# Altium PCB ACX720-v2机械文件.PcbDoc
Units mil, origin at the board's own origin, x right, y up, seen from the top; angles counter-clockwise.
Board outline 5900.04 x 4300 mil, 2 copper layers (TOP, BOTTOM), stack 10.4 mil thick; 33 components, 449 nets, 276 pads, 32 vias.
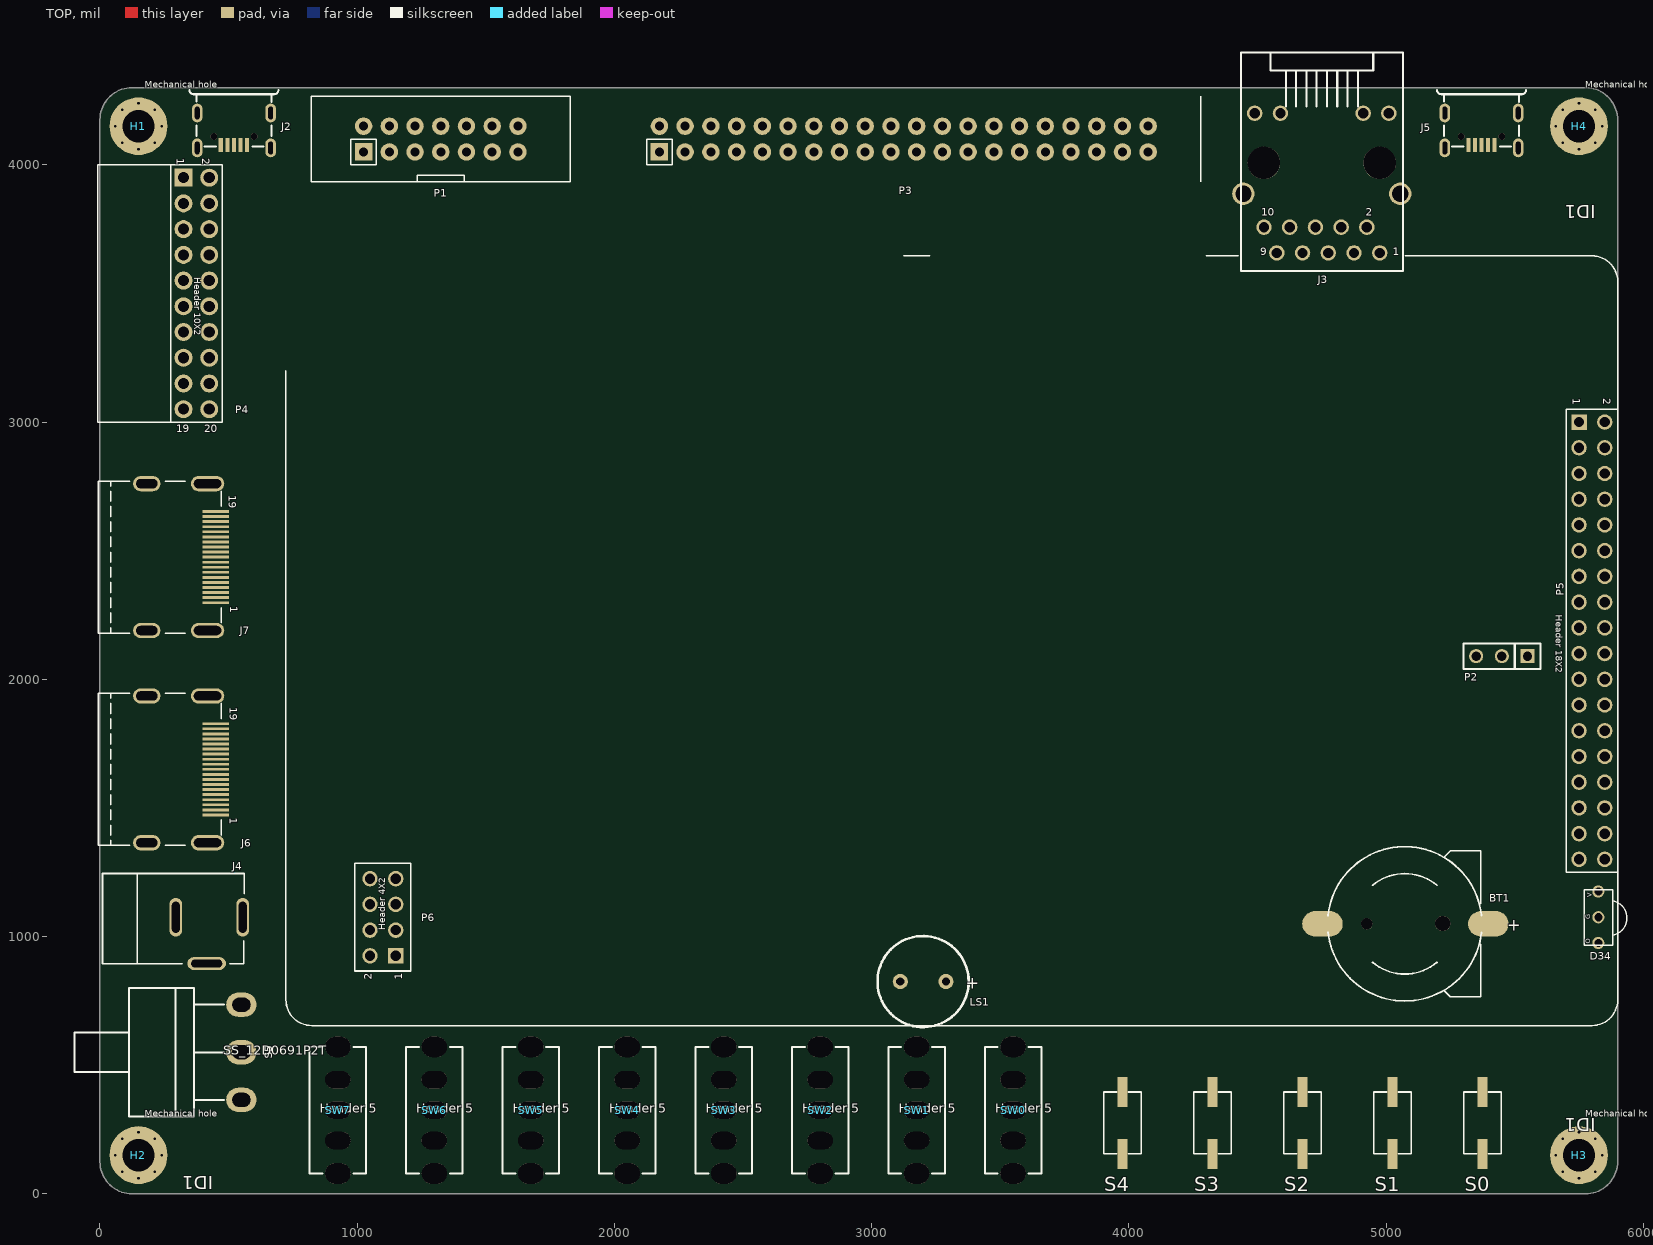
[diagram p0: TOP view]
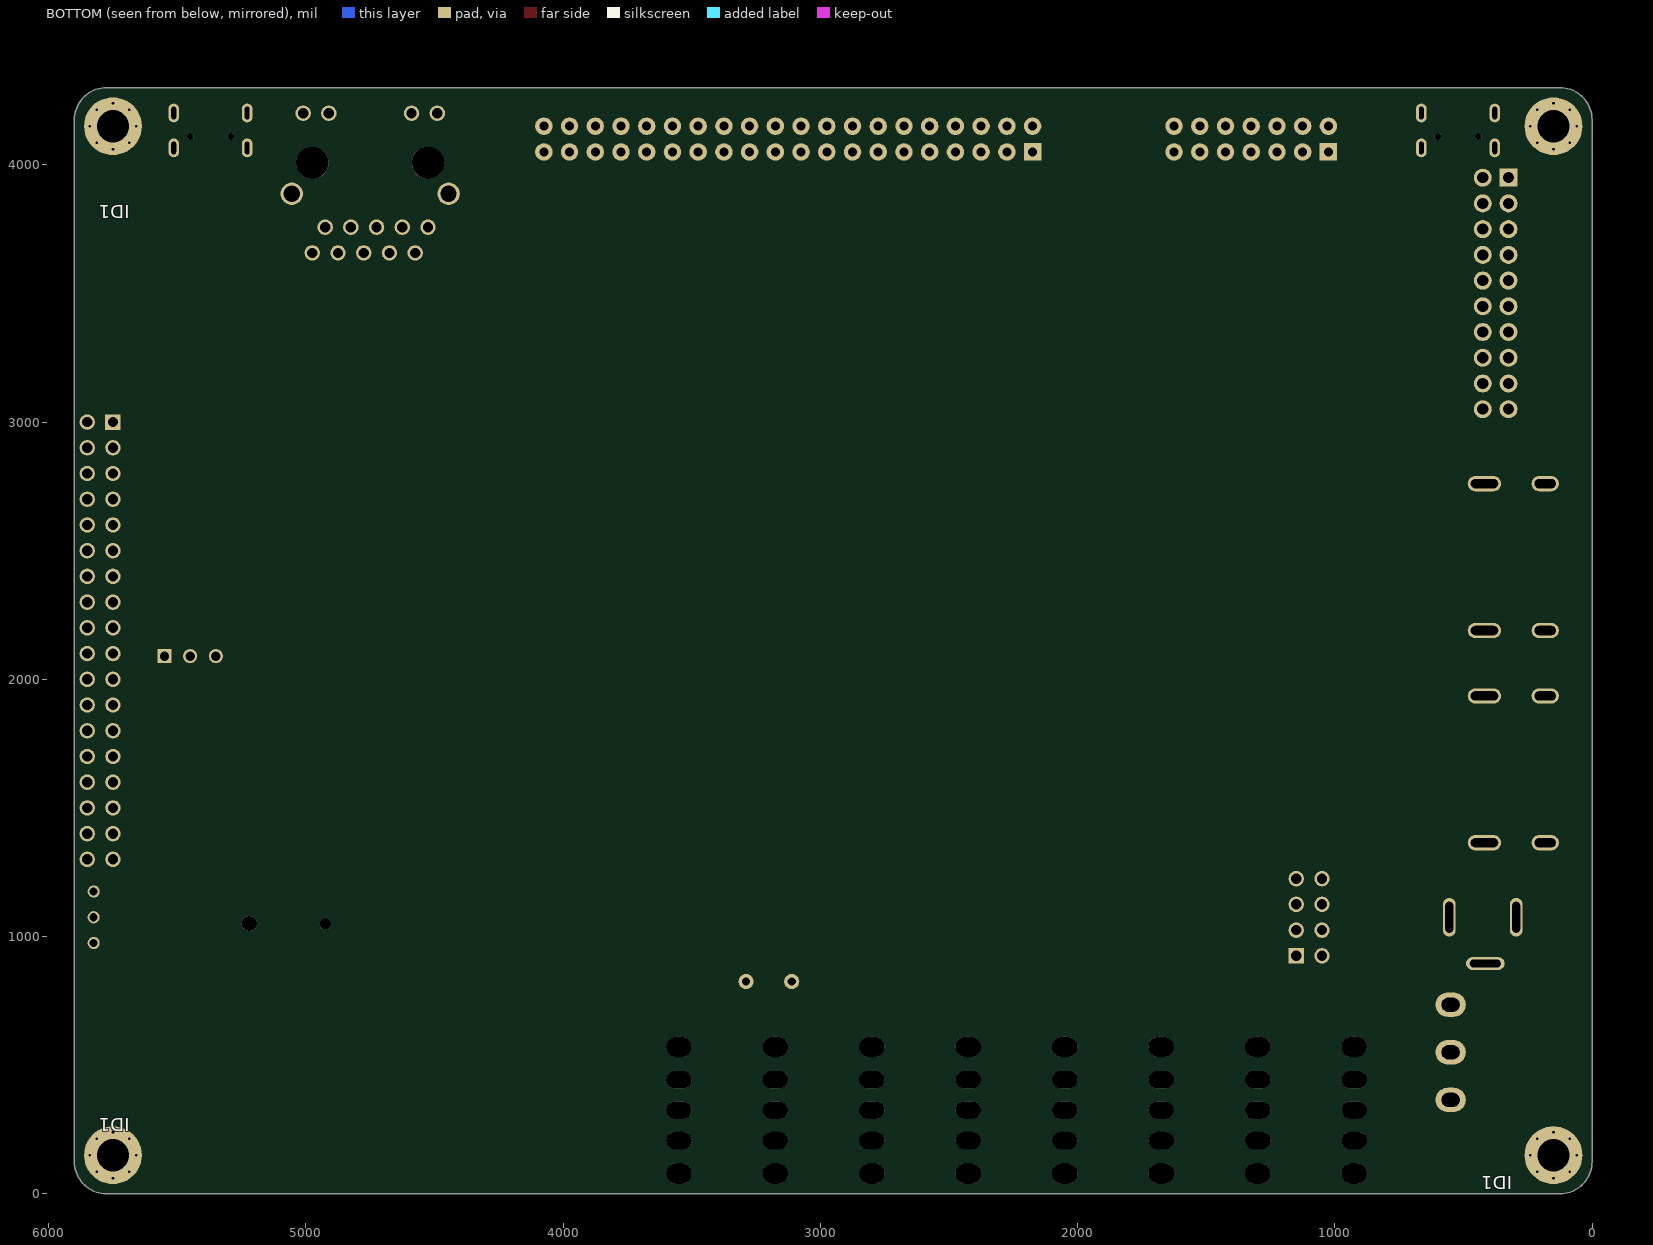
[diagram p1: BOTTOM view, seen from below]

## Layer stack, top to bottom
Top Solder: solder mask 0.4, Solder Resist, Dk 3.5
TOP: signal copper 1.2
Dielectric 1: core 8, FR-4, Dk 4.5
BOTTOM: signal copper 1.2
Bottom Solder: solder mask 0.4, Solder Resist, Dk 3.5

## Board outline
125,0 cw(c125,125) 0,4175 cw(c125,4175) 5775,4300 cw(c5775,4175) 5900.04,125 cw(c5775.04,125) 125,0

## Design rules (kind name [scope] priority, off if disabled: settings)
Clearance [All] p1: gap=10 ignorepadtopadclearanceinfootprint=FALSE except(0: Arc-Hole Track-Hole SMDPad-Hole THPad-Hole Via-Hole Fill-Hole Poly-Hole Region-Hole Text-Hole)
DiffPairsRouting [All] p1: maxlimit=10 minlimit=10 mostfreqgap=10 toplayer_minwidth=15 toplayer_maxwidth=15 toplayer_prefwidth=15 bottomlayer_minwidth=15 bottomlayer_maxwidth=15 bottomlayer_prefwidth=15 maxuncoupledlength=500
PlaneConnect [All] p1: planeconnectstyle=Direct reliefexpansion=20 reliefentries=4 reliefconductorwidth=10 reliefairgap=10
PolygonConnect [All] p1: connectstyle=Direct reliefconductorwidth=10 reliefentries=4 polygonreliefangle="90 Angle" airgapwidth=10
RoutingVias [All] p1: holewidth=28 width=50 viastyle="Through Hole" minholewidth=28 minwidth=50 maxholewidth=28 maxwidth=50
SolderMaskExpansion [All] p1: expansion=4 istentingtop=FALSE
Width [All] p1: maxlimit=10 minlimit=10 preferedwidth=10 impedanceprofiledriven=TRUE minimp=52.570000 maximp=101.860000 favimp=46.590000
28 further rules are at their usual default settings.

## Classes and differential pairs
differential pair USB: +USB_N -USB_P
differential pair PHY_MDI3: +PHY_MDI3_N -PHY_MDI3_P
differential pair PHY_MDI2: +PHY_MDI2_N -PHY_MDI2_P
differential pair PHY_MDI1: +PHY_MDI1_N -PHY_MDI1_P
differential pair PHY_MDI0: +PHY_MDI0_N -PHY_MDI0_P
differential pair DIFFPAIR0: +NETJ2/2 -NETJ2/3
differential pair IO_L9_T1_DQS: +IO_L9N_T1_DQS/16 -IO_L9P_T1_DQS/16
differential pair DIFFPAIR13: +IO_L8N_T1/16 -IO_L8P_T1/16
differential pair DIFFPAIR10: +IO_L7N_T1/16 -IO_L7P_T1/16
differential pair DIFFPAIR12: +IO_L6N_T0_VREF/16 -IO_L6P_T0/16
differential pair DIFFPAIR8: +IO_L5N_T0/16 -IO_L5P_T0/16
differential pair DIFFPAIR14: +IO_L4N_T0/16 -IO_L4P_T0/16
differential pair DIFFPAIR11: +IO_L3N_T0_DQS/16 -IO_L3P_T0_DQS/16
differential pair DIFFPAIR5: +IO_L2N_T0/16 -IO_L2P_T0/16
differential pair DIFFPAIR15: +IO_L1N_T0/16 -IO_L1P_T0/16
differential pair DIFFPAIR4: +IO_L19N_T3_VREF/16 -IO_L19P_T3/16
differential pair DIFFPAIR1: +IO_L18N_T2/16 -IO_L18P_T2/16
differential pair IO_L17_T2: +IO_L17N_T2/16 -IO_L17P_T2/16
differential pair DIFFPAIR2: +IO_L15N_T2_DQS/16 -IO_L15P_T2_DQS/16
differential pair DIFFPAIR3: +IO_L14N_T2_SRCC/16 -IO_L14P_T2_SRCC/16
differential pair DIFFPAIR6: +IO_L13N_T2_MRCC/16 -IO_L13P_T2_MRCC/16
differential pair DIFFPAIR9: +IO_L12N_T1_MRCC/16 -IO_L12P_T1_MRCC/16
differential pair DIFFPAIR7: +IO_L11N_T1_SRCC/16 -IO_L11P_T1_SRCC/16
differential pair IO_L10_T1: +IO_L10N_T1/16 -IO_L10P_T1/16
differential pair HDMI2_D2: +HDMI2_D2_N -HDMI2_D2_P
differential pair HDMI2_D1: +HDMI2_D1_N -HDMI2_D1_P
differential pair HDMI2_D0: +HDMI2_D0_N -HDMI2_D0_P
differential pair HDMI2_CLK: +HDMI2_CLK_N -HDMI2_CLK_P
differential pair HDMI1_D2: +HDMI1_D2_N -HDMI1_D2_P
differential pair HDMI1_D1: +HDMI1_D1_N -HDMI1_D1_P
differential pair HDMI1_D0: +HDMI1_D0_N -HDMI1_D0_P
differential pair HDMI1_CLK: +HDMI1_CLK_N -HDMI1_CLK_P
differential pair DDR3_DQS_1: +DDR3_DQS_N1 -DDR3_DQS_P1
differential pair DDR3_DQS_0: +DDR3_DQS_N0 -DDR3_DQS_P0
differential pair DDR3_CK: +DDR3_CK_N -DDR3_CK_P
differential pair USB: +D_P -USB_N
differential pair USB: +D_N -D_P

## Components (designator, comment, footprint, x,y, rotation, side; value= is the part's Value field where it differs from the comment)
BT1 "CR1220" CR1220 5075.04,1049.51 r180 top
D34 "SIP3" SIP3 5825.04,1075 r90 top
H1 "HOLE5R715MM3R175MM-8STAR" HOLE5R715MM3R175MM-8STAR 150,4150 r0 top
H2 "HOLE5R715MM3R175MM-8STAR" HOLE5R715MM3R175MM-8STAR 150,150 r0 top
H3 "HOLE5R715MM3R175MM-8STAR" HOLE5R715MM3R175MM-8STAR 5750,150 r0 top
H4 "HOLE5R715MM3R175MM-8STAR" HOLE5R715MM3R175MM-8STAR 5750,4150 r0 top
J2 "USB-MICRO" USB-MICRO 525.04,4150 r180 top
J3 "RJ45_HR911130C" RJ45_HR911130C 4750,4020 r0 top
J4 "JACK_PWR" JACK_PWR 285.04,1070 r90 top
J5 "USB-MICRO" USB-MICRO 5375.04,4150 r180 top
J6 "HDMI_A" HDMI_A 262.99,1650 r270 top
J7 "HDMI_A" HDMI_A 262.99,2475 r270 top
LS1 "BEEP09X05" BEEP09X05 3200.04,825 r180 top
P1 "IDC3-14" IDC3-14 1322.54,4100 r0 top
P2 "HDR1X3" HDR1X3 5450.04,2090 r180 top
P3 "IDC-40J" IDC-40J 3125.04,4100 r0 top
P4 "HD20-100-R" HD20-100-R 232.5,3500 r270 top
P5 "HDR2X18" HDR2X18 5800,2150 r270 top locked
P6 "HDR2X4" HDR2X4 1100.04,1075 r90 top
S0 "SW-PB_3_6_4_3" SW-PB_3_6_4_3 5375.04,275 r90 top
S1 "SW-PB_3_6_4_3" SW-PB_3_6_4_3 5025.04,275 r90 top
S2 "SW-PB_3_6_4_3" SW-PB_3_6_4_3 4675.04,275 r90 top
S3 "SW-PB_3_6_4_3" SW-PB_3_6_4_3 4325.04,275 r90 top
S4 "SW-PB_3_6_4_3" SW-PB_3_6_4_3 3975.04,275 r90 top
S5 "SS12D06_1P2T_" SS12D06_1P2T_ 455.04,550 r0 top
SW0 "SW-1X2" SW-1X2 3550.04,325 r0 top
SW1 "SW-1X2" SW-1X2 3175.04,325 r0 top
SW2 "SW-1X2" SW-1X2 2800.04,325 r0 top
SW3 "SW-1X2" SW-1X2 2425.04,325 r0 top
SW4 "SW-1X2" SW-1X2 2050.04,325 r0 top
SW5 "SW-1X2" SW-1X2 1675.04,325 r0 top
SW6 "SW-1X2" SW-1X2 1300.04,325 r0 top
SW7 "SW-1X2" SW-1X2 925.04,325 r0 top

## Footprints (in the part's own frame and the unit in brackets; to place one, negate y for a bottom-side part, rotate by r counter-clockwise, add the part's x,y. Pads: shape width x height; smd on the part's side, far side on the other; paste and mask are expansions set on the pad)
BEEP09X05 [mil] "BEEP09X05"
  round 59.06 hole 31.5: 1(-88.58,0) 2(88.58,0)
  silkscreen extent -177,-177 177,177, body extent -128,-39 128,39, height 150
CR1220 [mil] "CR1220"
  round 59.06 hole 59.06 unplated: 0(-145.14,-0.98)
  round 43.31 hole 43.31 unplated: 0/2(150.14,0)
  oval 157.48x98.43 smd: 1(-322.5,0) 2(322.5,0)
  silkscreen extent -296,-300 301,300, body extent -401,-49 401,49, height 150
HD20-100-R [mil] "HD20-100-R"
  rect 70x70 / inner round 70 / far side rect 70x70 hole 43: 1(-450,92.5)
  round 70 hole 43: 2(-450,192.5) 3(-350,92.5) 4(-350,192.5) 5(-250,92.5) 6(-250,192.5) 7(-150,92.5) 8(-150,192.5) 9(-50,92.5) 10(-50,192.5) 11(50,92.5) 12(50,192.5) 13(150,92.5) 14(150,192.5) 15(250,92.5) 16(250,192.5) 17(350,92.5) 18(350,192.5) 19(450,92.5) 20(450,192.5)
  silkscreen extent -500,-241 500,243, body extent -500,-243 500,243, height 150
HDMI_A [mm] "HDMI_A"
  rect 0.28x2.6 smd: 1(4.5,4.75) 2(4,4.75) 3(3.5,4.75) 4(3,4.75) 5(2.5,4.75) 6(2,4.75) 7(1.5,4.75) 8(1,4.75) 9(0.5,4.75) 10(0,4.75) 11(-0.5,4.75) 12(-1,4.75) 13(-1.5,4.75) 14(-2,4.75) 15(-2.5,4.75) 16(-3,4.75) 17(-3.5,4.75) 18(-4,4.75) 19(-4.5,4.75)
  oval 1.5x3.3 hole 0.9 slot 2.7 at 90 deg: 20(-7.25,3.95) 21(7.25,3.95)
  oval 1.5x2.7 hole 0.9 slot 2.1 at 90 deg: 22(-7.25,-2.05) 23(7.25,-2.05)
  silkscreen extent -7.5,-6.85 7.5,5.3, body extent -7.5,-5.75 7.5,5.75, height 3.81
HDR1X3 [mil] "HDR1X3"
  rect 55x55 / inner round 55 / far side rect 55x55 hole 36: 1(-100,0)
  round 55 hole 36: 2(0,0) 3(100,0)
  silkscreen extent -150,-50 150,50, body extent -154,-54 154,54, height 150
HDR2X4 [mil] "HDR2X4"
  rect 60x60 / inner round 60 / far side rect 60x60 hole 40: 1(-150,-50)
  round 60 hole 40: 2(-150,50) 3(-50,-50) 4(-50,50) 5(50,-50) 6(50,50) 7(150,-50) 8(150,50)
  silkscreen extent -209,-109 209,109, body extent -210,-110 210,110, height 150
HDR2X18 [mil] "HDR2X18"
  rect 60x60 / inner round 60 / far side rect 60x60 hole 40: 1(-850,-50)
  round 60 hole 40: 2(-850,50) 3(-750,-50) 4(-750,50) 5(-650,-50) 6(-650,50) 7(-550,-50) 8(-550,50) 9(-450,-50) 10(-450,50) 11(-350,-50) 12(-350,50) 13(-250,-50) 14(-250,50) 15(-150,-50) 16(-150,50) 17(-50,-50) 18(-50,50) 19(50,-50) 20(50,50) 21(150,-50) 22(150,50) 23(250,-50) 24(250,50) 25(350,-50) 26(350,50) 27(450,-50) 28(450,50) 29(550,-50) 30(550,50) 31(650,-50) 32(650,50) 33(750,-50) 34(750,50) 35(850,-50) 36(850,50)
  silkscreen extent -1496,-5077 1496,100, body extent -900,-100 900,100, height 150
HOLE5R715MM3R175MM-8STAR [mil] "HOLE5R715MM3R175MM-8STAR"
  round 225 hole 125: 1(0,0)
  body extent -115,-115 115,115, height 150
IDC3-14 [mil] "IDC3-14"
  rect 68x68 / inner round 68 / far side rect 68x68 hole 35: 1(-297.5,-50)
  round 68 hole 35: 2(-297.5,50) 3(-197.5,-50) 4(-197.5,50) 5(-97.5,-50) 6(-97.5,50) 7(2.5,-50) 8(2.5,50) 9(102.5,-50) 10(102.5,50) 11(202.5,-50) 12(202.5,50) 13(302.5,-50) 14(302.5,50)
  silkscreen extent -501,-167 506,167, body extent -502,-165 502,165, height 150
IDC-40J [mil] "IDC-40J"
  rect 68x68 / inner round 68 / far side rect 68x68 hole 35: 1(-950,-50)
  round 68 hole 35: 2(-950,50) 3(-850,-50) 4(-850,50) 5(-750,-50) 6(-750,50) 7(-650,-50) 8(-650,50) 9(-550,-50) 10(-550,50) 11(-450,-50) 12(-450,50) 13(-350,-50) 14(-350,50) 15(-250,-50) 16(-250,50) 17(-150,-50) 18(-150,50) 19(-50,-50) 20(-50,50) 21(50,-50) 22(50,50) 23(150,-50) 24(150,50) 25(250,-50) 26(250,50) 27(350,-50) 28(350,50) 29(450,-50) 30(450,50) 31(550,-50) 32(550,50) 33(650,-50) 34(650,50) 35(750,-50) 36(750,50) 37(850,-50) 38(850,50) 39(950,-50) 40(950,50)
  silkscreen extent -1000,-167 1154,167, body extent -1155,-165 1155,165, height 150
JACK_PWR [mil] "JACK_PWR"
  oval 50x150 hole 30 slot 120 at 90 deg: 1(-175,-130)
  oval 150x50 hole 120 slot 30 at 90 deg: 2(5,-270) 3(5,-10)
  silkscreen extent -175,-276 175,275, body extent -180,-280 180,280, height 150
RJ45_HR911130C [mil] "RJ45_HR911130C"
  round 60 hole 40: 1(225.2,-362.5) 2(175.2,-262.5) 3(125.2,-362.5) 4(75.2,-262.5) 5(25.2,-362.5) 6(-24.8,-262.5) 7(-74.8,-362.5) 8(-124.8,-262.5) 9(-174.8,-362.5) 10(-224.8,-262.5) 11(260.83,180.41) 12(160.83,180.41) 13(-160.83,180.41) 14(-260.83,180.41)
  round 87 hole 63: 15(304.92,-132.58) 16(-304.92,-132.58)
  round 126 hole 126 unplated: ""(-225,-12.5) ""(225,-12.5)
  silkscreen extent -315,-433 315,417, body extent -320,-422 320,422, height 150
SIP3 [mil] "SIP3"
  round 47.24 hole 31.5: 1(-100,0) 2(0,0) 3(100,0)
  silkscreen extent -109,-111 107,55, body extent -124,-24 124,24, height 150
SS12D06_1P2T_ [mm] "SS12D06_1P2T_"
  oval 3x2.4 hole 1.4 slot 1.8 at 0 deg: 1(2.413,4.7) 2(2.413,0) 3(2.413,-4.7)
  silkscreen extent -14.09,-6.35 0.71,6.35, body extent -4.19,-6.35 4.19,6.35, height 3.81
SW-1X2 [mm] "SW-1X2"
  oval 2.5x2 hole 2 slot 2.5 at 0 deg: 1(0,6.25) 5(0,-6.25)
  oval 2.5x1.7 hole 1.7 slot 2.5 at 0 deg: 2(0,3) 3(0,0) 4(0,-3)
  silkscreen extent -2.79,-6.25 2.79,6.25, body extent -2.79,-6.35 2.79,6.35, height 3.81
SW-PB_3_6_4_3 [mm] "SW-PB_3_6_4_3"
  rect 3x1 smd: 1(-3.061,0) 2(3.061,0)
  silkscreen extent -3.04,-1.85 3.06,1.85, body extent -4.57,-1.91 4.57,1.91, height 3.81
USB-MICRO [mil] "USB-MICRO"
  rect 15.75x55.12 smd: 1(-47.18,72.5) 2(-21.59,72.5) 3(4,72.5) 4(29.59,72.5) 5(55.18,72.5)
  oval 41.34x72.83 hole 49.21 slot 17.72 at 0 deg: 6(-138.72,84.31) 7(-138.72,-51.52) 8(146.72,-51.52) 9(146.72,84.31)
  round 25.59 hole 25.59 unplated: ""(-74.74,40.02) ""(82.74,40.02)
  silkscreen extent -169,-141 177,79, body extent -154,-129 154,129, height 150

## Via types
v1: diameter 22/22 (per signal layer), hole 10, TOP to BOTTOM, 32 vias

## Nets (pads, with @x,y where several pads share a name; then routed paths per layer and width w, separated by ;. In a path a pad name is that pad's centre, name@x,y a point inside that pad or via, vN(x,y) a via of type N, cw(c..) or ccw(c..) an arc to the next point about the centre after c; other vN are vias at no path point)
1V0_PG: 
1V5_PG: 
1V8_PG: 
AVDD10: 
BEEP: 
CLKOUT: 
CMOS_D0: P4.16
CMOS_D1: P4.15
CMOS_D2: P4.14
CMOS_D3: P4.13
CMOS_D4: P4.12
CMOS_D5: P4.11
CMOS_D6: P4.10
CMOS_D7: P4.9
CMOS_HREF: P4.6
CMOS_PCLK: P4.7
CMOS_PWDN: P4.18
CMOS_RST: P4.17
CMOS_SCLK: P4.3
CMOS_SDA: P4.4
CMOS_VSYNC: P4.5
CMOS_XCLK: P4.8
D_N: 
D_P: 
DDR3_ADDR0: 
DDR3_ADDR1: 
DDR3_ADDR2: 
DDR3_ADDR3: 
DDR3_ADDR4: 
DDR3_ADDR5: 
DDR3_ADDR6: 
DDR3_ADDR7: 
DDR3_ADDR8: 
DDR3_ADDR9: 
DDR3_ADDR10: 
DDR3_ADDR11: 
DDR3_ADDR12: 
DDR3_ADDR13: 
DDR3_BA0: 
DDR3_BA1: 
DDR3_BA2: 
DDR3_CAS_N: 
DDR3_CK_N: 
DDR3_CK_P: 
DDR3_CKE0: 
DDR3_CS0_N: 
DDR3_DM0: 
DDR3_DM1: 
DDR3_DQ0: 
DDR3_DQ1: 
DDR3_DQ2: 
DDR3_DQ3: 
DDR3_DQ4: 
DDR3_DQ5: 
DDR3_DQ6: 
DDR3_DQ7: 
DDR3_DQ8: 
DDR3_DQ9: 
DDR3_DQ10: 
DDR3_DQ11: 
DDR3_DQ12: 
DDR3_DQ13: 
DDR3_DQ14: 
DDR3_DQ15: 
DDR3_DQS_N0: 
DDR3_DQS_N1: 
DDR3_DQS_P0: 
DDR3_DQS_P1: 
DDR3_ODT0: 
DDR3_RAS_N: 
DDR3_RESET_N: 
DDR3_VREF: 
DDR3_VTT: 
DDR3_WE_N: 
DONE: 
DVDD10: 
E_COL: P2.2
E_CRS: 
E_GTXC: 
E_MDC: 
E_MDIO: 
E_RESET: 
E_RXC: 
E_RXD0: 
E_RXD1: 
E_RXD2: 
E_RXD3: 
E_RXD4: 
E_RXD5: 
E_RXD6: 
E_RXD7: 
E_RXDV: 
E_RXER: 
E_TXC: 
E_TXD0: 
E_TXD1: 
E_TXD2: 
E_TXD3: 
E_TXD4: 
E_TXD5: 
E_TXD6: 
E_TXD7: 
E_TXEN: 
E_TXER: 
ENSWREG: 
EX_VCC: J4.2 S5.3
FPGA_GCLK1: 
FPGA_UART_RX: 
FPGA_UART_TX: 
GND: BT1.2 D34.2 H1.1 H2.1 H3.1 H4.1 J2.4 J2.5 J2.6 J2.7 J2.8 J2.9 J3.10 J3.12 J3.15 J3.16 J4.1 J4.3 J5.4 J5.5 J5.6 J5.7 J5.8 J5.9 J6.2 J6.5 J6.8 J6.11 J6.17 J6.20 J6.21 J6.22 J6.23 J7.2 J7.5 J7.8 J7.11 J7.17 J7.20 J7.21 J7.22 J7.23 P1.1 P1.3 P1.5 P1.7 P1.9 P1.11 P1.13 P3.12 P3.30 P4.2 P5.2 P5.24 P5.28 P5.29 S0.1 S1.1 S2.1 S3.1 S4.1 SW0.1 SW0.5 SW1.1 SW1.5 SW2.1 SW2.5 SW3.1 SW3.5 SW4.1 SW4.5 SW5.1 SW5.5 SW6.1 SW6.5 SW7.1 SW7.5
  other v1: 150,60 5750,60 86.36,86.36 213.64,86.36 5686.36,86.36 5813.64,86.36 60,150 240,150 5660,150 5840,150 86.36,213.64 213.64,213.64 5686.36,213.64 5813.64,213.64 150,240 5750,240 150,4060 5750,4060 86.36,4086.36 213.64,4086.36 5686.36,4086.36 5813.64,4086.36 60,4150 240,4150 5660,4150 5840,4150 86.36,4213.64 213.64,4213.64 5686.36,4213.64 5813.64,4213.64 150,4240 5750,4240
HDMI1_5V: J6.18
HDMI1_CLK_N: J6.12
HDMI1_CLK_P: J6.10
HDMI1_D0_N: J6.9
HDMI1_D0_P: J6.7
HDMI1_D1_N: J6.6
HDMI1_D1_P: J6.4
HDMI1_D2_N: J6.3
HDMI1_D2_P: J6.1
HDMI1_DDC_CLK: J6.15
HDMI1_DDC_DATA: J6.16
HDMI1_HPD: 
HDMI1_OE: 
HDMI1_SCL: 
HDMI1_SDA: 
HDMI2_5V: J7.18
HDMI2_CLK_N: J7.12
HDMI2_CLK_P: J7.10
HDMI2_D0_N: J7.9
HDMI2_D0_P: J7.7
HDMI2_D1_N: J7.6
HDMI2_D1_P: J7.4
HDMI2_D2_N: J7.3
HDMI2_D2_P: J7.1
HDMI2_DDC_CLK: J7.15
HDMI2_DDC_DATA: J7.16
HDMI2_HPD: 
HDMI2_OE: 
HDMI2_SCL: 
HDMI2_SDA: 
HEX_A: 
HEX_B: 
HEX_C: 
HEX_D: 
HEX_DP: 
HEX_E: 
HEX_F: 
HEX_G: 
HEX_SEL0: 
HEX_SEL1: 
HEX_SEL2: 
HEX_SEL3: 
HEX_SEL4: 
HEX_SEL5: 
HEX_SEL6: 
HEX_SEL7: 
IIC_SCL: 
IIC_SDA: 
IO_25/14: P5.6
IO_25/35: P5.19
IO_L1N_T0/16: P3.8
IO_L1P_T0/16: P3.7
IO_L2N_T0/16: P3.32
IO_L2P_T0/16: P3.31
IO_L3N_T0_DQS/16: P3.18
IO_L3P_T0_DQS/16: P3.17
IO_L4N_T0/16: P3.10
IO_L4P_T0/16: P3.9
IO_L5N_T0/16: P3.24
IO_L5P_T0/16: P3.23
IO_L6N_T0_VREF/16: P3.16
IO_L6P_T0/16: P3.15
IO_L7N_T1/16: P3.20
IO_L7P_T1/16: P3.19
IO_L8N_T1/16: P3.14
IO_L8P_T1/16: P3.13
IO_L9N_T1_DQS/16: P3.4
IO_L9P_T1_DQS/16: P3.3
IO_L10N_T1/16: P3.2
IO_L10P_T1/16: P3.1
IO_L10P_T1_AD15P/35: P5.17
IO_L11N_T1_SRCC/16: P3.26
IO_L11P_T1_SRCC/16: P3.25
IO_L12N_T1_MRCC/16: P3.22
IO_L12P_T1_MRCC/16: P3.21
IO_L13N_T2_MRCC/16: P3.28
IO_L13P_T2_MRCC/16: P3.27
IO_L14N_T2_SRCC/16: P3.36
IO_L14P_T2_SRCC/16: P3.35
IO_L15N_T2_DQS/16: P3.38
IO_L15P_T2_DQS/16: P3.37
IO_L17N_T2/16: P3.6
IO_L17P_T2/16: P3.5
IO_L17P_T2/35: P5.18
IO_L18N_T2/16: P3.40
IO_L18N_T2_A11_D27/14: P5.12
IO_L18P_T2/16: P3.39
IO_L19N_T3_A09_D25_VREF/14: P5.16
IO_L19N_T3_VREF/16: P3.34
IO_L19N_T3_VREF/35: P5.34
IO_L19P_T3/16: P3.33
IO_L19P_T3/35: P5.23
IO_L19P_T3_A10_D26/14: P5.4
IO_L20N_T3/35: P5.36
IO_L20N_T3_A07_D23/14: P5.11
IO_L20P_T3/35: P5.35
IO_L20P_T3_A08_D24/14: P5.10
IO_L21N_T3_DQS/35: P5.31
IO_L21N_T3_DQS_A06_D22/14: P5.13
IO_L21P_T3_DQS/14: P5.9
IO_L21P_T3_DQS/35: P5.32
IO_L22N_T3_A04_D20/14: P5.15
IO_L22P_T3/35: P5.33
IO_L22P_T3_A05_D21/14: P5.7
IO_L23N_T3/35: P5.20
IO_L23N_T3_A02_D18/14: P5.5
IO_L23P_T3/35: P5.21
IO_L23P_T3_A03_D19/14: P5.3
IO_L24N_T3/35: P5.22
IO_L24N_T3_A00_D16/14: P5.14
IO_L24P_T3/35: P5.25
IO_L24P_T3_A01_D17/14: P5.8
IR: 
IRIN: 
KWYIN0: S0.2
KWYIN1: S1.2
KWYIN2: S2.2
KWYIN3: S3.2
KWYIN4: S4.2
LED0: 
LED1: 
LED2: 
LED3: 
LED4: 
LED5: 
LED6: 
LED7: 
MODE0: 
NETBT1/1: BT1.1
NETC1/1: 
NETC3/2: 
NETC24/2: 
NETC41/1: LS1.2
NETC50/1: 
NETC51/1: 
NETC53/1: 
NETC63/2: J3.1
NETC69/2: 
NETC70/2: 
NETC84/2: 
NETC106/2: 
NETC108/2: 
NETC196/2: 
NETC200/2: 
NETD1/2: 
NETD6/1: 
NETD7/1: 
NETD8/1: 
NETD9/1: 
NETD11/1: 
NETD12/1: 
NETD13/1: 
NETD14/1: 
NETD16/1: 
NETD17/1: 
NETD18/2: 
NETD19/1: 
NETD19/2: 
NETD34/1: D34.1
NETD35/1: 
NETF1/2: 
NETF2/2: 
NETFB2/2: 
NETFB4/1: P4.1
NETJ2/2: J2.2
NETJ2/3: J2.3
NETJ3/11: J3.11
NETJ3/13: J3.13
NETJ6/19: J6.19
NETJ7/19: J7.19
NETL1/1: 
NETL2/1: 
NETL3/1: 
NETL4/1: 
NETL5/1: 
NETP2/1: P2.1
NETP2/3: P2.3
NETP6/1: P6.1 P6.3 P6.5
NETP6/2: P6.2
NETP6/4: P6.4
NETP6/6: P6.6
NETQ1/1: 
NETQ1/3: 
NETQ2/1: 
NETQ3/1: 
NETQ3/3: 
NETR3/1: 
NETR4/1: 
NETR5/1: 
NETR6/1: 
NETR9/1: 
NETR14/2: 
NETR26/1: 
NETR31/1: 
NETR35/1: 
NETR49/1: 
NETR56/1: 
NETR57/1: 
NETR58/1: 
NETR60/2: 
NETR61/1: 
NETR63/2: 
NETR65/2: 
NETR69/2: 
NETR80/2: 
NETR82/1: SW0.4
NETR83/1: SW1.4
NETR84/1: SW2.4
NETR85/1: SW3.4
NETR86/1: SW4.4
NETR87/1: SW5.4
NETR88/1: SW6.4
NETR89/1: SW7.4
NETR90/1: SW0.2
NETR91/1: SW1.2
NETR92/1: SW2.2
NETR93/1: SW3.2
NETR94/1: SW4.2
NETR95/1: SW5.2
NETR96/1: SW6.2
NETR97/1: SW7.2
NETR98/2: 
NETR99/2: 
NETR100/2: 
NETR101/2: 
NETR102/2: 
NETR103/2: 
NETR104/2: 
NETR105/2: 
NETR113/2: 
NETR117/1: 
NETR123/1: 
NETR124/1: 
NETR125/1: 
NETR126/1: 
NETR127/1: 
NETR128/1: 
NETR129/1: 
NETR130/1: 
NETR145/1: 
NETR148/2: 
NETR152/2: 
NETR161/1: 
NETR164/2: 
NETR168/2: 
NETU24/9: 
PHY_AD0/LED0: 
PHY_AD1/LED1: 
PHY_MDI0_N: J3.3
PHY_MDI0_P: J3.2
PHY_MDI1_N: J3.7
PHY_MDI1_P: J3.4
PHY_MDI2_N: J3.6
PHY_MDI2_P: J3.5
PHY_MDI3_N: J3.9
PHY_MDI3_P: J3.8
PME: 
PW_GOOD: 
QSPI_CS: 
QSPI_DQ0: 
QSPI_DQ1: 
QSPI_DQ2: 
QSPI_DQ3: 
QSPI_SCK: 
S0: 
S1: 
S2: 
S3: 
S4: 
SEG7_DIO: 
SEG7_RCLK: 
SEG7_SCLK: 
SW0: 
SW1: 
SW2: 
SW3: 
SW4: 
SW5: 
SW6: 
SW7: 
SWIN0: SW0.3
SWIN1: SW1.3
SWIN2: SW2.3
SWIN3: SW3.3
SWIN4: SW4.3
SWIN5: SW5.3
SWIN6: SW6.3
SWIN7: SW7.3
TCK: P1.6
TDI_FPGA: P1.10
TDO_FPGA: P1.8
TMS: P1.4
USB_FD0: 
USB_FD1: 
USB_FD2: 
USB_FD3: 
USB_FD4: 
USB_FD5: 
USB_FD6: 
USB_FD7: 
USB_FD8: 
USB_FD9: 
USB_FD10: 
USB_FD11: 
USB_FD12: 
USB_FD13: 
USB_FD14: 
USB_FD15: 
USB_FIFOADR0: 
USB_FIFOADR1: 
USB_FLAGA: 
USB_FLAGB: 
USB_FLAGC: 
USB_IFCLK: 
USB_N: J5.2
USB_P: J5.3
USB_PA0: 
USB_PA1: 
USB_PA3: 
USB_PKTEND: 
USB_RESET: 
USB_SCL: 
USB_SDA: 
USB_SLCS: 
USB_SLOE: 
USB_SLRD: 
USB_SLWR: 
USB_UART_VBUS: J2.1
USB_VBUS: J5.1
USB_XIN: 
USB_XOUT: 
VCC1V0: 
VCC1V5_DDR3: 
VCC1V8: 
VCC3V3: J3.14 LS1.1 P1.2 P3.29 P5.1 P5.26 P5.27 P6.7
VCC3V3_UART: 
VCC3V3_USB: 
VCC5V0: D34.3 P3.11 P5.30 S5.2
VCCIO: P6.8
pads on no net: BT1.0 BT1.0/2 J2. J3. J5. J6.13 J6.14 J7.13 J7.14 P1.12 P1.14 P4.19 P4.20 S5.1

## Silkscreen, mask and mechanical layers (free items; w line width, h text height)
Top Overlay:
  text "ID1" at 5815.04,3843 h51 r180
  text "ID1" at 5815.04,293 h51 r180
  text "ID1" at 440.04,68 h51 r180
Bottom Overlay:
  text "ID1" at 5685.04,3843 h51 r180
  text "ID1" at 5685.04,293 h51 r180
  text "ID1" at 310.04,68 h51 r180
OUTLINE:
  lines w6: 0,125 ccw(c125,125) 125,0 5775.04,0 ccw(c5775.04,125) 5900.04,125 5900,4175 ccw(c5775,4175) 5775,4300 125,4300 ccw(c125,4175) 0,4175 0,125
PLACE_BOUND_TOP:
  region: 437.34,150 436.14,162.15 432.6,173.84 426.84,184.61 419.09,194.05 409.65,201.8 398.88,207.56 387.19,211.1 375.04,212.3 362.89,211.1 351.2,207.56 344.02,203.72 340.43,201.8 330.99,194.05 323.24,184.61 317.48,173.84 313.94,162.15 312.74,150 313.94,137.85 317.48,126.16 323.24,115.39 330.99,105.95 340.43,98.2 344.02,96.28 351.2,92.44 362.89,88.9 375.04,87.7 387.19,88.9 398.88,92.44 409.65,98.2 419.09,105.95 426.84,115.39 432.6,126.16 436.14,137.85 437.34,150
  region: 5812.34,3925 5811.14,3937.15 5807.6,3948.84 5801.84,3959.61 5794.09,3969.05 5784.65,3976.8 5773.88,3982.56 5762.19,3986.1 5750.04,3987.3 5737.89,3986.1 5726.2,3982.56 5719.02,3978.72 5715.43,3976.8 5705.99,3969.05 5698.24,3959.61 5692.48,3948.84 5688.94,3937.15 5687.74,3925 5688.94,3912.85 5692.48,3901.16 5698.24,3890.39 5705.99,3880.95 5715.43,3873.2 5719.02,3871.28 5726.2,3867.44 5737.89,3863.9 5750.04,3862.7 5762.19,3863.9 5773.88,3867.44 5784.65,3873.2 5794.09,3880.95 5801.84,3890.39 5807.6,3901.16 5811.14,3912.85 5812.34,3925
  region: 5812.34,375 5811.14,387.15 5807.6,398.84 5801.84,409.61 5794.09,419.05 5784.65,426.8 5773.88,432.56 5762.19,436.1 5750.04,437.3 5737.89,436.1 5726.2,432.56 5719.02,428.72 5715.43,426.8 5705.99,419.05 5698.24,409.61 5692.48,398.84 5688.94,387.15 5687.74,375 5688.94,362.85 5692.48,351.16 5698.24,340.39 5705.99,330.95 5715.43,323.2 5719.02,321.28 5726.2,317.44 5737.89,313.9 5750.04,312.7 5762.19,313.9 5773.88,317.44 5784.65,323.2 5794.09,330.95 5801.84,340.39 5807.6,351.16 5811.14,362.85 5812.34,375
PLACE_BOUND_BOTTOM:
  region: 5812.34,3925 5811.14,3937.15 5807.6,3948.84 5801.84,3959.61 5794.09,3969.05 5784.65,3976.8 5773.88,3982.56 5762.19,3986.1 5750.04,3987.3 5737.89,3986.1 5726.2,3982.56 5719.02,3978.72 5715.43,3976.8 5705.99,3969.05 5698.24,3959.61 5692.48,3948.84 5688.94,3937.15 5687.74,3925 5688.94,3912.85 5692.48,3901.16 5698.24,3890.39 5705.99,3880.95 5715.43,3873.2 5719.02,3871.28 5726.2,3867.44 5737.89,3863.9 5750.04,3862.7 5762.19,3863.9 5773.88,3867.44 5784.65,3873.2 5794.09,3880.95 5801.84,3890.39 5807.6,3901.16 5811.14,3912.85 5812.34,3925
  region: 437.34,150 436.14,162.15 432.6,173.84 426.84,184.61 419.09,194.05 409.65,201.8 398.88,207.56 387.19,211.1 375.04,212.3 362.89,211.1 351.2,207.56 344.02,203.72 340.43,201.8 330.99,194.05 323.24,184.61 317.48,173.84 313.94,162.15 312.74,150 313.94,137.85 317.48,126.16 323.24,115.39 330.99,105.95 340.43,98.2 344.02,96.28 351.2,92.44 362.89,88.9 375.04,87.7 387.19,88.9 398.88,92.44 409.65,98.2 419.09,105.95 426.84,115.39 432.6,126.16 436.14,137.85 437.34,150
  region: 5812.34,375 5811.14,387.15 5807.6,398.84 5801.84,409.61 5794.09,419.05 5784.65,426.8 5773.88,432.56 5762.19,436.1 5750.04,437.3 5737.89,436.1 5726.2,432.56 5719.02,428.72 5715.43,426.8 5705.99,419.05 5698.24,409.61 5692.48,398.84 5688.94,387.15 5687.74,375 5688.94,362.85 5692.48,351.16 5698.24,340.39 5705.99,330.95 5715.43,323.2 5719.02,321.28 5726.2,317.44 5737.89,313.9 5750.04,312.7 5762.19,313.9 5773.88,317.44 5784.65,323.2 5794.09,330.95 5801.84,340.39 5807.6,351.16 5811.14,362.85 5812.34,375
NCLEGEND-1-6:
  circle w1: c7549.5,2340 r19.68
  circle w1: c7549.5,590 r21.66
  circle w1: c7549.5,1590 r29.53
  circle w1: c7549.5,1340 r31.5
  circle w1: c7549.5,840 r12.79
  circle w1: c7549.5,3340 r15.75
  lines w1: 7100,-1285 11936,-1285 ; 7100,-1035 11936,-1035 ; 7100,-785 11936,-785 ; 7100,-535 11936,-535 ; 7100,-285 11936,-285 ; 7100,-35 11936,-35 ; 7100,215 11936,215 ; 7100,465 11936,465 ; 7100,715 11936,715 ; 7100,965 11936,965 ; 7100,1215 11936,1215 ; 7100,1465 11936,1465 ; 7100,1715 11936,1715 ; 7100,1965 11936,1965 ; 7100,2215 11936,2215 ; 7100,2465 11936,2465 ; 7100,2715 11936,2715 ; 7100,2965 11936,2965 ; 7100,3215 11936,3215 ; 7100,3465 11936,3465 ; 7100,3715 11936,3715 ; 7100,3965 11936,3965 ; 7100,4215 11936,4215 ; 7100,4465 11936,4465 ; 7100,4715 11936,4715 ; 7100,4965 11936,4965 ; 7499.5,2590 7599.5,2590 ; 7499.5,3840 7599.5,3840 ; 7524.5,4090 7574.5,4090 ; 7524.5,4340 7574.5,4340 ; 7549.5,2540 7549.5,2640 ; 7549.5,3790 7549.5,3890 ; 7549.5,4065 7549.5,4115 ; 7549.5,4315 7549.5,4365 ; 7999,-1535 7999,4715 ; 9890,-1535 9890,4715 ; 11161,-1535 11161,4715 ; 7100,-1535 7100,5215 11936,5215 11936,-1535 7100,-1535 ; 7486.5,27 7612.5,27 7612.5,153 7486.5,153 7486.5,27 ; 7487,1027.5 7612,1027.5 7612,1152.5 7487,1152.5 7487,1027.5 ; 7504.5,-1440 ccw(c7504.5,-1410) 7504.5,-1380 7594.5,-1380 ccw(c7594.5,-1410) 7594.5,-1440 7504.5,-1440 ; 7504.5,-1190 ccw(c7504.5,-1160) 7504.5,-1130 7594.5,-1130 ccw(c7594.5,-1160) 7594.5,-1190 7504.5,-1190 ; 7506.2,2090 7518.89,2059.39 7549.5,2046.7 7580.11,2059.39 7592.8,2090 7580.11,2120.61 7549.5,2133.3 7518.89,2120.61 7506.2,2090 ; 7514.06,-945.43 ccw(c7514.06,-910) 7514.06,-874.57 7584.94,-874.57 ccw(c7584.94,-910) 7584.94,-945.43 7514.06,-945.43 ; 7517.03,3590 7526.54,3567.04 7549.5,3557.53 7572.46,3567.04 7581.97,3590 7572.46,3612.96 7549.5,3622.47 7526.54,3612.96 7517.03,3590 ; 7525.88,-695.43 ccw(c7525.88,-660) 7525.88,-624.57 7573.12,-624.57 ccw(c7573.12,-660) 7573.12,-695.43 7525.88,-695.43 ; 7529.5,1820 7569.5,1820 7569.5,1860 7529.5,1860 7529.5,1820 ; 7533.76,-177.72 ccw(c7533.76,-160) 7533.76,-142.28 7565.24,-142.28 ccw(c7565.24,-160) 7565.24,-177.72 7533.76,-177.72 ; 7533.75,3090 7549.5,3105.75 7565.25,3090 7549.5,3074.25 7533.75,3090 ; 7541.62,-465.12 ccw(c7541.62,-410) 7541.62,-354.88 7557.38,-354.88 ccw(c7557.38,-410) 7557.38,-465.12 7541.62,-465.12 ; 7549.5,2805 cw(c7549.5,2840) 7549.5,2875 cw(c7549.5,2840) 7549.5,2805
  text "DRILL CHART: TOP to BOTTOM" at 8218,5027.5 h125
  text "ALL UNITS ARE IN MILS" at 8468,4777.5 h125
  text "FIGURE" at 7249.5,4527.5 h125
  text "SIZE" at 8744.5,4527.5 h125
  text "PLATED" at 10225.5,4527.5 h125
  text "QTY" at 11398.5,4527.5 h125
  text "8.0" at 8794.5,4277.5 h125
  text "PLATED" at 10225.5,4277.5 h125
  text "945" at 11398.5,4277.5 h125
  text "10.0" at 8744.5,4027.5 h125
  text "PLATED" at 10225.5,4027.5 h125
  text "701" at 11398.5,4027.5 h125
  text "16.0" at 8744.5,3777.5 h125
  text "PLATED" at 10225.5,3777.5 h125
  text "77" at 11448.5,3777.5 h125
  text "30.0" at 8744.5,3527.5 h125
  text "PLATED" at 10225.5,3527.5 h125
  text "24" at 11448.5,3527.5 h125
  text "31.5" at 8744.5,3277.5 h125
  text "PLATED" at 10225.5,3277.5 h125
  text "2" at 11498.5,3277.5 h125
  text "31.5" at 8744.5,3027.5 h125
  text "PLATED" at 10225.5,3027.5 h125
  text "3" at 11498.5,3027.5 h125
  text "35.0" at 8744.5,2777.5 h125
  text "PLATED" at 10225.5,2777.5 h125
  text "54" at 11448.5,2777.5 h125
  text "36.0" at 8744.5,2527.5 h125
  text "PLATED" at 10225.5,2527.5 h125
  text "3" at 11498.5,2527.5 h125
  text "39.37" at 8694.5,2277.5 h125
  text "PLATED" at 10225.5,2277.5 h125
  text "24" at 11448.5,2277.5 h125
  text "40.0" at 8744.5,2027.5 h125
  text "PLATED" at 10225.5,2027.5 h125
  text "58" at 11448.5,2027.5 h125
  text "43.0" at 8744.5,1777.5 h125
  text "PLATED" at 10225.5,1777.5 h125
  text "20" at 11448.5,1777.5 h125
  text "59.06" at 8694.5,1527.5 h125
  text "PLATED" at 10225.5,1527.5 h125
  text "16" at 11448.5,1527.5 h125
  text "63.0" at 8744.5,1277.5 h125
  text "PLATED" at 10225.5,1277.5 h125
  text "2" at 11498.5,1277.5 h125
  text "125.0" at 8694.5,1027.5 h125
  text "PLATED" at 10225.5,1027.5 h125
  text "4" at 11498.5,1027.5 h125
  text "25.59" at 8694.5,777.5 h125
  text "NON-PLATED" at 10025.5,777.5 h125
  text "4" at 11498.5,777.5 h125
  text "43.31" at 8694.5,527.5 h125
  text "NON-PLATED" at 10025.5,527.5 h125
  text "1" at 11498.5,527.5 h125
  text "59.06" at 8694.5,277.5 h125
  text "NON-PLATED" at 10025.5,277.5 h125
  text "1" at 11498.5,277.5 h125
  text "126.0" at 8694.5,27.5 h125
  text "NON-PLATED" at 10025.5,27.5 h125
  text "2" at 11498.5,27.5 h125
  text "49.21x17.72" at 8394.5,-222.5 h125
  text "PLATED" at 10225.5,-222.5 h125
  text "8" at 11498.5,-222.5 h125
  text "70.87x55.12" at 8394.5,-472.5 h125
  text "PLATED" at 10225.5,-472.5 h125
  text "3" at 11498.5,-472.5 h125
  text "82.68x35.43" at 8394.5,-722.5 h125
  text "PLATED" at 10225.5,-722.5 h125
  text "4" at 11498.5,-722.5 h125
  text "106.3x35.43" at 8394.5,-972.5 h125
  text "PLATED" at 10225.5,-972.5 h125
  text "4" at 11498.5,-972.5 h125
  text "120.0x30.0" at 8444.5,-1222.5 h125
  text "PLATED" at 10225.5,-1222.5 h125
  text "1" at 11498.5,-1222.5 h125
  text "120.0x30.0" at 8444.5,-1472.5 h125
  text "PLATED" at 10225.5,-1472.5 h125
  text "2" at 11498.5,-1472.5 h125
DRAWING_ORIGIN:
  lines w1: -25,0 25,0 ; 0,-25 0,25
PIN_NUMBER:
  text "1" at 5730.04,3925 h25 r180
  text "1" at 5730.04,3925 h25 r180
  text "1" at 5730.04,375 h25 r180
  text "1" at 5730.04,375 h25 r180
  text "1" at 355.04,150 h25 r180
  text "1" at 355.04,150 h25 r180
ASSEMBLY_BOTTOM:
  text "ID*" at 5685.04,3843 h51 r180
  text "ID*" at 5685.04,293 h51 r180
  text "ID*" at 310.04,68 h51 r180
ASSEMBLY_TOP:
  text "ID*" at 5815.04,3843 h51 r180
  text "ID*" at 5815.04,293 h51 r180
  text "ID1" at 440.04,68 h51 r180
Mechanical 255:
  lines w1: 3025.04,1400 4100.04,1400 4100.04,2500 3025.04,2500 3025.04,1400

## Text inside footprints (layer, text, board x,y; h text height)
BT1: PIN_NUMBER "0/2" at 4894.9,1049.51 h25 r180; PIN_NUMBER "0" at 5210.18,1050.49 h25 r180; PIN_NUMBER "2" at 4742.54,1049.51 h25 r180; PIN_NUMBER "1" at 5387.54,1049.51 h25 r180; Top Overlay "+" at 5522.5,1062.5 h45 r180
D34: PIN_NUMBER "3" at 5815.04,1175 h25 r90; PIN_NUMBER "2" at 5815.04,1075 h25 r90; PIN_NUMBER "1" at 5815.04,975 h25 r90; Top Overlay "O" at 5794.49,972.44 h18.9 r90; Top Overlay "V" at 5799.49,1152.44 h18.9 r90; Top Overlay "G" at 5794.49,1067.44 h18.9 r90
H1: PIN_NUMBER "1" at 140,4150 h25; Top Overlay "Mechanical hole" at 175,4300 h25
H2: PIN_NUMBER "1" at 140,150 h25; Top Overlay "Mechanical hole" at 175,300 h25
H3: PIN_NUMBER "1" at 5740,150 h25; Top Overlay "Mechanical hole" at 5775,300 h25
H4: PIN_NUMBER "1" at 5740,4150 h25; Top Overlay "Mechanical hole" at 5775,4300 h25
J2: PIN_NUMBER "1" at 544.22,4088.5 h25 r180; PIN_NUMBER "7" at 638.84,4211.2 h25 r180; PIN_NUMBER "8" at 349.24,4214.2 h25 r180; PIN_NUMBER "6" at 638.84,4075.37 h25 r180; PIN_NUMBER "9" at 349.24,4078.37 h25 r180; PIN_NUMBER "4" at 467.45,4088.5 h25 r180; PIN_NUMBER "5" at 441.86,4088.5 h25 r180; PIN_NUMBER "2" at 518.63,4088.5 h25 r180; PIN_NUMBER "3" at 493.04,4088.5 h25 r180
J3: PIN_NUMBER "8" at 4615.2,3757.5 h25; PIN_NUMBER "9" at 4565.2,3657.5 h25; PIN_NUMBER "5" at 4765.2,3657.5 h25; PIN_NUMBER "6" at 4715.2,3757.5 h25; PIN_NUMBER "4" at 4815.2,3757.5 h25; PIN_NUMBER "7" at 4665.2,3657.5 h25; PIN_NUMBER "2" at 4915.2,3757.5 h25; PIN_NUMBER "3" at 4865.2,3657.5 h25; PIN_NUMBER "14" at 4469.17,4200.41 h25; PIN_NUMBER "12" at 4890.83,4200.41 h25; PIN_NUMBER "15" at 5034.92,3887.42 h25; PIN_NUMBER "16" at 4425.08,3887.42 h25; PIN_NUMBER "10" at 4505.2,3757.5 h25; PIN_NUMBER "1" at 4965.2,3657.5 h25; PIN_NUMBER "11" at 4990.83,4200.41 h25; PIN_NUMBER "13" at 4569.17,4200.41 h25; Top Overlay "10" at 4515,3802.5 h30; Top Overlay "9" at 4510,3647.5 h30; Top Overlay "2" at 4920,3802.5 h30; Top Overlay "1" at 5025,3647.5 h30
J4: PIN_NUMBER "2" at 545.04,1075 h25 r90; PIN_NUMBER "3" at 285.04,1075 h25 r90; PIN_NUMBER "1" at 405.04,895 h25 r90
J5: PIN_NUMBER "1" at 5394.22,4088.5 h25 r180; PIN_NUMBER "3" at 5343.04,4088.5 h25 r180; PIN_NUMBER "2" at 5368.63,4088.5 h25 r180; PIN_NUMBER "7" at 5488.84,4211.2 h25 r180; PIN_NUMBER "8" at 5199.24,4214.2 h25 r180; PIN_NUMBER "6" at 5488.84,4075.37 h25 r180; PIN_NUMBER "4" at 5317.45,4088.5 h25 r180; PIN_NUMBER "5" at 5291.86,4088.5 h25 r180; PIN_NUMBER "9" at 5199.24,4078.37 h25 r180
J6: PIN_NUMBER "20" at 378.5,1935.43 h25 r270; PIN_NUMBER "22" at 142.28,1935.43 h25 r270; PIN_NUMBER "21" at 378.5,1364.57 h25 r270; PIN_NUMBER "23" at 142.28,1364.57 h25 r270; PIN_NUMBER "17" at 430,1787.8 h25 r270; PIN_NUMBER "5" at 440,1551.57 h25 r270; PIN_NUMBER "8" at 440,1610.63 h25 r270; PIN_NUMBER "11" at 430,1669.69 h25 r270; PIN_NUMBER "2" at 440,1492.52 h25 r270; PIN_NUMBER "14" at 430,1728.74 h25 r270; PIN_NUMBER "13" at 430,1709.06 h25 r270; PIN_NUMBER "19" at 430,1827.17 h25 r270; PIN_NUMBER "16" at 430,1768.11 h25 r270; PIN_NUMBER "15" at 430,1748.43 h25 r270; PIN_NUMBER "18" at 430,1807.48 h25 r270; PIN_NUMBER "1" at 440,1472.83 h25 r270; PIN_NUMBER "3" at 440,1512.2 h25 r270; PIN_NUMBER "4" at 440,1531.89 h25 r270; PIN_NUMBER "6" at 440,1571.26 h25 r270; PIN_NUMBER "7" at 440,1590.94 h25 r270; PIN_NUMBER "9" at 440,1630.31 h25 r270; PIN_NUMBER "10" at 430,1650 h25 r270; PIN_NUMBER "12" at 430,1689.37 h25 r270; Top Overlay "19" at 505,1890.5 h30 r270; Top Overlay "1" at 505,1462.5 h30 r270
J7: PIN_NUMBER "20" at 378.5,2760.43 h25 r270; PIN_NUMBER "22" at 142.28,2760.43 h25 r270; PIN_NUMBER "21" at 378.5,2189.57 h25 r270; PIN_NUMBER "23" at 142.28,2189.57 h25 r270; PIN_NUMBER "17" at 430,2612.8 h25 r270; PIN_NUMBER "8" at 440,2435.63 h25 r270; PIN_NUMBER "11" at 430,2494.69 h25 r270; PIN_NUMBER "2" at 440,2317.52 h25 r270; PIN_NUMBER "5" at 440,2376.57 h25 r270; PIN_NUMBER "14" at 430,2553.74 h25 r270; PIN_NUMBER "13" at 430,2534.06 h25 r270; PIN_NUMBER "19" at 430,2652.17 h25 r270; PIN_NUMBER "16" at 430,2593.11 h25 r270; PIN_NUMBER "15" at 430,2573.43 h25 r270; PIN_NUMBER "18" at 430,2632.48 h25 r270; PIN_NUMBER "1" at 440,2297.83 h25 r270; PIN_NUMBER "3" at 440,2337.2 h25 r270; PIN_NUMBER "4" at 440,2356.89 h25 r270; PIN_NUMBER "6" at 440,2396.26 h25 r270; PIN_NUMBER "7" at 440,2415.94 h25 r270; PIN_NUMBER "9" at 440,2455.31 h25 r270; PIN_NUMBER "10" at 430,2475 h25 r270; PIN_NUMBER "12" at 430,2514.37 h25 r270; Top Overlay "19" at 500,2715.5 h30 r270; Top Overlay "1" at 507.5,2283 h30 r270
LS1: PIN_NUMBER "1" at 3278.62,825 h25 r180; PIN_NUMBER "2" at 3101.46,825 h25 r180; Top Overlay "+" at 3417.5,837.5 h45 r180
P1: PIN_NUMBER "14" at 1605.04,4150 h25; PIN_NUMBER "12" at 1505.04,4150 h25; PIN_NUMBER "2" at 1015.04,4150 h25; PIN_NUMBER "4" at 1115.04,4150 h25; PIN_NUMBER "8" at 1315.04,4150 h25; PIN_NUMBER "10" at 1405.04,4150 h25; PIN_NUMBER "6" at 1215.04,4150 h25; PIN_NUMBER "13" at 1605.04,4050 h25; PIN_NUMBER "11" at 1505.04,4050 h25; PIN_NUMBER "7" at 1315.04,4050 h25; PIN_NUMBER "9" at 1415.04,4050 h25; PIN_NUMBER "5" at 1215.04,4050 h25; PIN_NUMBER "1" at 1015.04,4050 h25; PIN_NUMBER "3" at 1115.04,4050 h25
P2: PIN_NUMBER "2" at 5440.04,2090 h25 r180; PIN_NUMBER "1" at 5540.04,2090 h25 r180; PIN_NUMBER "3" at 5340.04,2090 h25 r180
P3: PIN_NUMBER "11" at 2655.04,4050 h25; PIN_NUMBER "29" at 3555.04,4050 h25; PIN_NUMBER "30" at 3555.04,4150 h25; PIN_NUMBER "12" at 2655.04,4150 h25; PIN_NUMBER "33" at 3755.04,4050 h25; PIN_NUMBER "34" at 3755.04,4150 h25; PIN_NUMBER "39" at 4055.04,4050 h25; PIN_NUMBER "40" at 4055.04,4150 h25; PIN_NUMBER "5" at 2365.04,4050 h25; PIN_NUMBER "6" at 2365.04,4150 h25; PIN_NUMBER "37" at 3955.04,4050 h25; PIN_NUMBER "38" at 3955.04,4150 h25; PIN_NUMBER "35" at 3855.04,4050 h25; PIN_NUMBER "36" at 3855.04,4150 h25; PIN_NUMBER "27" at 3455.04,4050 h25; PIN_NUMBER "28" at 3455.04,4150 h25; PIN_NUMBER "21" at 3155.04,4050 h25; PIN_NUMBER "22" at 3155.04,4150 h25; PIN_NUMBER "25" at 3355.04,4050 h25; PIN_NUMBER "26" at 3355.04,4150 h25; PIN_NUMBER "1" at 2165.04,4050 h25; PIN_NUMBER "2" at 2165.04,4150 h25; PIN_NUMBER "3" at 2265.04,4050 h25; PIN_NUMBER "4" at 2265.04,4150 h25; PIN_NUMBER "13" at 2755.04,4050 h25; PIN_NUMBER "14" at 2755.04,4150 h25; PIN_NUMBER "19" at 3055.04,4050 h25; PIN_NUMBER "20" at 3055.04,4150 h25; PIN_NUMBER "15" at 2855.04,4050 h25; PIN_NUMBER "16" at 2855.04,4150 h25; PIN_NUMBER "23" at 3255.04,4050 h25; PIN_NUMBER "24" at 3255.04,4150 h25; PIN_NUMBER "9" at 2565.04,4050 h25; PIN_NUMBER "10" at 2555.04,4150 h25; PIN_NUMBER "17" at 2955.04,4050 h25; PIN_NUMBER "18" at 2955.04,4150 h25; PIN_NUMBER "31" at 3655.04,4050 h25; PIN_NUMBER "32" at 3655.04,4150 h25; PIN_NUMBER "7" at 2465.04,4050 h25; PIN_NUMBER "8" at 2465.04,4150 h25
P4: PIN_NUMBER "2" at 415,3950 h25 r270; PIN_NUMBER "20" at 385,3025 h25 r270; PIN_NUMBER "19" at 285,3025 h25 r270; PIN_NUMBER "1" at 315,3950 h25 r270; PIN_NUMBER "8" at 415,3650 h25 r270; PIN_NUMBER "5" at 315,3750 h25 r270; PIN_NUMBER "4" at 415,3850 h25 r270; PIN_NUMBER "3" at 315,3850 h25 r270; PIN_NUMBER "17" at 285,3125 h25 r270; PIN_NUMBER "18" at 385,3125 h25 r270; PIN_NUMBER "7" at 315,3650 h25 r270; PIN_NUMBER "6" at 415,3750 h25 r270; PIN_NUMBER "9" at 315,3550 h25 r270; PIN_NUMBER "10" at 405,3550 h25 r270; PIN_NUMBER "11" at 285,3425 h25 r270; PIN_NUMBER "12" at 385,3425 h25 r270; PIN_NUMBER "13" at 285,3325 h25 r270; PIN_NUMBER "14" at 385,3325 h25 r270; PIN_NUMBER "15" at 285,3225 h25 r270; PIN_NUMBER "16" at 385,3225 h25 r270; Top Overlay "20" at 406,2960 h30; Top Overlay "19" at 296,2960 h30; Top Overlay "2" at 398,4025 h30 r270; Top Overlay "Header 10X2" at 366.67,3563 h25 r270; Top Overlay "1" at 298,4025 h30 r270
P5: PIN_NUMBER "6" at 5840,2800 h25 r270; PIN_NUMBER "12" at 5830,2500 h25 r270; PIN_NUMBER "16" at 5830,2300 h25 r270; PIN_NUMBER "4" at 5840,2900 h25 r270; PIN_NUMBER "11" at 5730,2500 h25 r270; PIN_NUMBER "10" at 5830,2600 h25 r270; PIN_NUMBER "13" at 5730,2400 h25 r270; PIN_NUMBER "9" at 5740,2600 h25 r270; PIN_NUMBER "15" at 5730,2300 h25 r270; PIN_NUMBER "7" at 5740,2700 h25 r270; PIN_NUMBER "5" at 5740,2800 h25 r270; PIN_NUMBER "3" at 5740,2900 h25 r270; PIN_NUMBER "14" at 5830,2400 h25 r270; PIN_NUMBER "8" at 5840,2700 h25 r270; PIN_NUMBER "19" at 5730,2100 h25 r270; PIN_NUMBER "17" at 5730,2200 h25 r270; PIN_NUMBER "18" at 5830,2200 h25 r270; PIN_NUMBER "34" at 5830,1400 h25 r270; PIN_NUMBER "23" at 5730,1900 h25 r270; PIN_NUMBER "36" at 5830,1300 h25 r270; PIN_NUMBER "35" at 5730,1300 h25 r270; PIN_NUMBER "31" at 5730,1500 h25 r270; PIN_NUMBER "32" at 5830,1500 h25 r270; PIN_NUMBER "33" at 5730,1400 h25 r270; PIN_NUMBER "20" at 5830,2100 h25 r270; PIN_NUMBER "21" at 5730,2000 h25 r270; PIN_NUMBER "22" at 5830,2000 h25 r270; PIN_NUMBER "25" at 5730,1800 h25 r270; PIN_NUMBER "29" at 5730,1600 h25 r270; PIN_NUMBER "28" at 5830,1700 h25 r270; PIN_NUMBER "24" at 5830,1900 h25 r270; PIN_NUMBER "2" at 5840,3000 h25 r270; PIN_NUMBER "26" at 5830,1800 h25 r270; PIN_NUMBER "1" at 5740,3000 h25 r270; PIN_NUMBER "27" at 5730,1700 h25 r270; PIN_NUMBER "30" at 5830,1600 h25 r270; Top Overlay "Header 18X2" at 5660,2250 h25 r270; Top Overlay "1" at 5725.63,3093.11 h30 r270; Top Overlay "2" at 5843.74,3093.11 h30 r270
P6: PIN_NUMBER "8" at 1040.04,1225 h25 r90; PIN_NUMBER "7" at 1140.04,1225 h25 r90; PIN_NUMBER "1" at 1140.04,925 h25 r90; PIN_NUMBER "5" at 1140.04,1125 h25 r90; PIN_NUMBER "3" at 1140.04,1025 h25 r90; PIN_NUMBER "2" at 1040.04,925 h25 r90; PIN_NUMBER "4" at 1040.04,1025 h25 r90; PIN_NUMBER "6" at 1040.04,1125 h25 r90; Top Overlay "2" at 1056.3,831.89 h30 r90; Top Overlay "1" at 1174.41,831.89 h30 r90; Top Overlay "Header 4X2" at 1110.04,1025 h25 r90
S0: PIN_NUMBER "2" at 5365.04,395.5 h25 r90; PIN_NUMBER "1" at 5365.04,154.5 h25 r90
S1: PIN_NUMBER "2" at 5015.04,395.5 h25 r90; PIN_NUMBER "1" at 5015.04,154.5 h25 r90
S2: PIN_NUMBER "2" at 4665.04,395.5 h25 r90; PIN_NUMBER "1" at 4665.04,154.5 h25 r90
S3: PIN_NUMBER "2" at 4315.04,395.5 h25 r90; PIN_NUMBER "1" at 4315.04,154.5 h25 r90
S4: PIN_NUMBER "2" at 3965.04,395.5 h25 r90; PIN_NUMBER "1" at 3965.04,154.5 h25 r90
S5: PIN_NUMBER "2" at 540.04,550 h25 r90; PIN_NUMBER "3" at 540.04,364.96 h25 r90; PIN_NUMBER "1" at 540.04,735.04 h25 r90; Top Overlay "SS_12D0691P2T" at 480.04,540 h35
SW0: PIN_NUMBER "3" at 3540.04,325 h25; PIN_NUMBER "1" at 3540.04,571.06 h25; PIN_NUMBER "5" at 3540.04,78.94 h25; PIN_NUMBER "4" at 3540.04,206.89 h25; PIN_NUMBER "2" at 3540.04,443.11 h25; Top Overlay "Header 5" at 3480.04,315 h35
SW1: PIN_NUMBER "3" at 3165.04,325 h25; PIN_NUMBER "1" at 3165.04,571.06 h25; PIN_NUMBER "5" at 3165.04,78.94 h25; PIN_NUMBER "4" at 3165.04,206.89 h25; PIN_NUMBER "2" at 3165.04,443.11 h25; Top Overlay "Header 5" at 3105.04,315 h35
SW2: PIN_NUMBER "3" at 2790.04,325 h25; PIN_NUMBER "1" at 2790.04,571.06 h25; PIN_NUMBER "5" at 2790.04,78.94 h25; PIN_NUMBER "4" at 2790.04,206.89 h25; PIN_NUMBER "2" at 2790.04,443.11 h25; Top Overlay "Header 5" at 2730.04,315 h35
SW3: PIN_NUMBER "3" at 2415.04,325 h25; PIN_NUMBER "1" at 2415.04,571.06 h25; PIN_NUMBER "5" at 2415.04,78.94 h25; PIN_NUMBER "4" at 2415.04,206.89 h25; PIN_NUMBER "2" at 2415.04,443.11 h25; Top Overlay "Header 5" at 2355.04,315 h35
SW4: PIN_NUMBER "3" at 2040.04,325 h25; PIN_NUMBER "1" at 2040.04,571.06 h25; PIN_NUMBER "5" at 2040.04,78.94 h25; PIN_NUMBER "4" at 2040.04,206.89 h25; PIN_NUMBER "2" at 2040.04,443.11 h25; Top Overlay "Header 5" at 1980.04,315 h35
SW5: PIN_NUMBER "3" at 1665.04,325 h25; PIN_NUMBER "1" at 1665.04,571.06 h25; PIN_NUMBER "5" at 1665.04,78.94 h25; PIN_NUMBER "4" at 1665.04,206.89 h25; PIN_NUMBER "2" at 1665.04,443.11 h25; Top Overlay "Header 5" at 1605.04,315 h35
SW6: PIN_NUMBER "3" at 1290.04,325 h25; PIN_NUMBER "1" at 1290.04,571.06 h25; PIN_NUMBER "5" at 1290.04,78.94 h25; PIN_NUMBER "4" at 1290.04,206.89 h25; PIN_NUMBER "2" at 1290.04,443.11 h25; Top Overlay "Header 5" at 1230.04,315 h35
SW7: PIN_NUMBER "3" at 915.04,325 h25; PIN_NUMBER "1" at 915.04,571.06 h25; PIN_NUMBER "5" at 915.04,78.94 h25; PIN_NUMBER "4" at 915.04,206.89 h25; PIN_NUMBER "2" at 915.04,443.11 h25; Top Overlay "Header 5" at 855.04,315 h35